# Altium PCB PCB1.pcbdoc
Units mil, origin at the board's own origin, x right, y up, seen from the top; angles counter-clockwise.
Board outline 2978.5 x 3631.66 mil, 2 copper layers (Top Layer, Bottom Layer); 9 components, 11 nets, 30 pads, 0 vias.
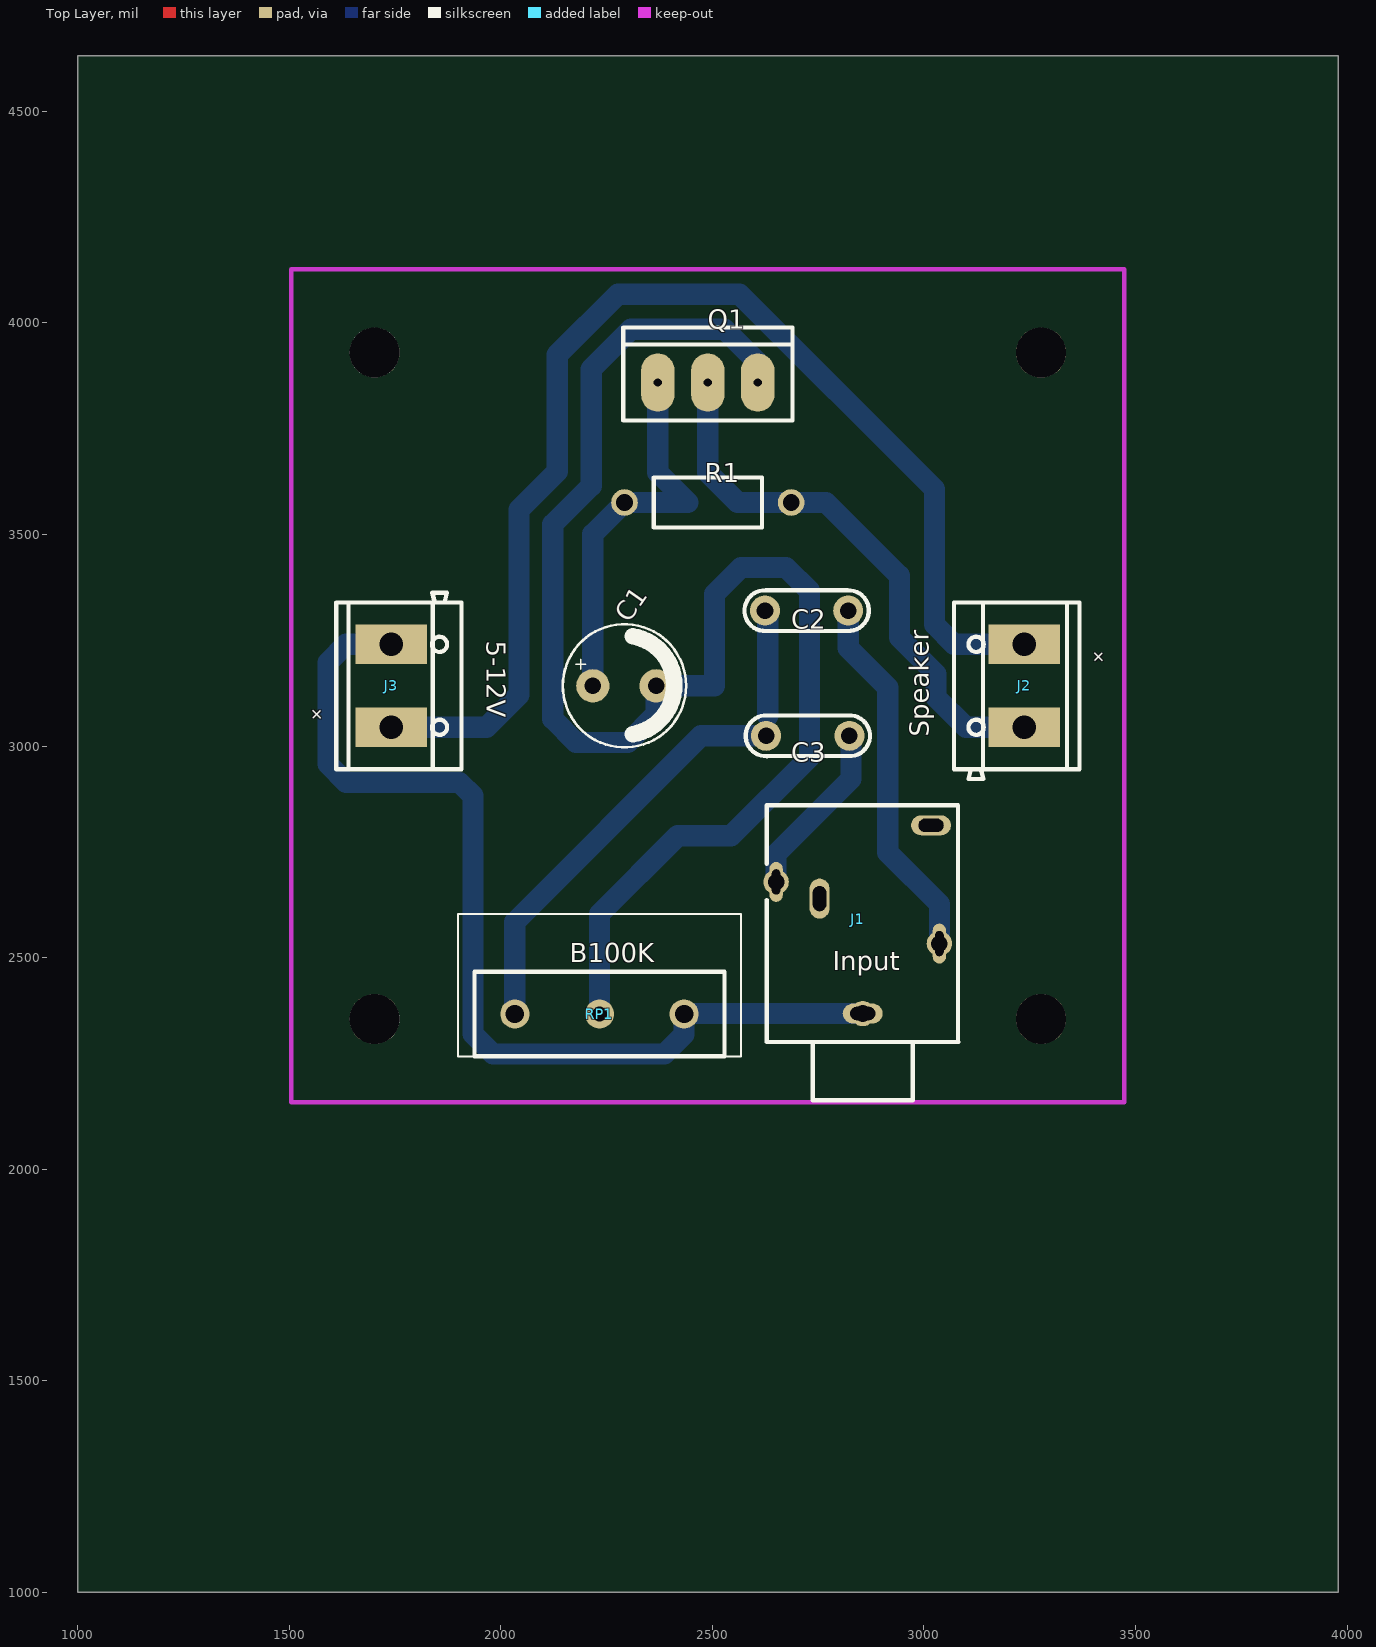
[diagram p0: Top Layer view]
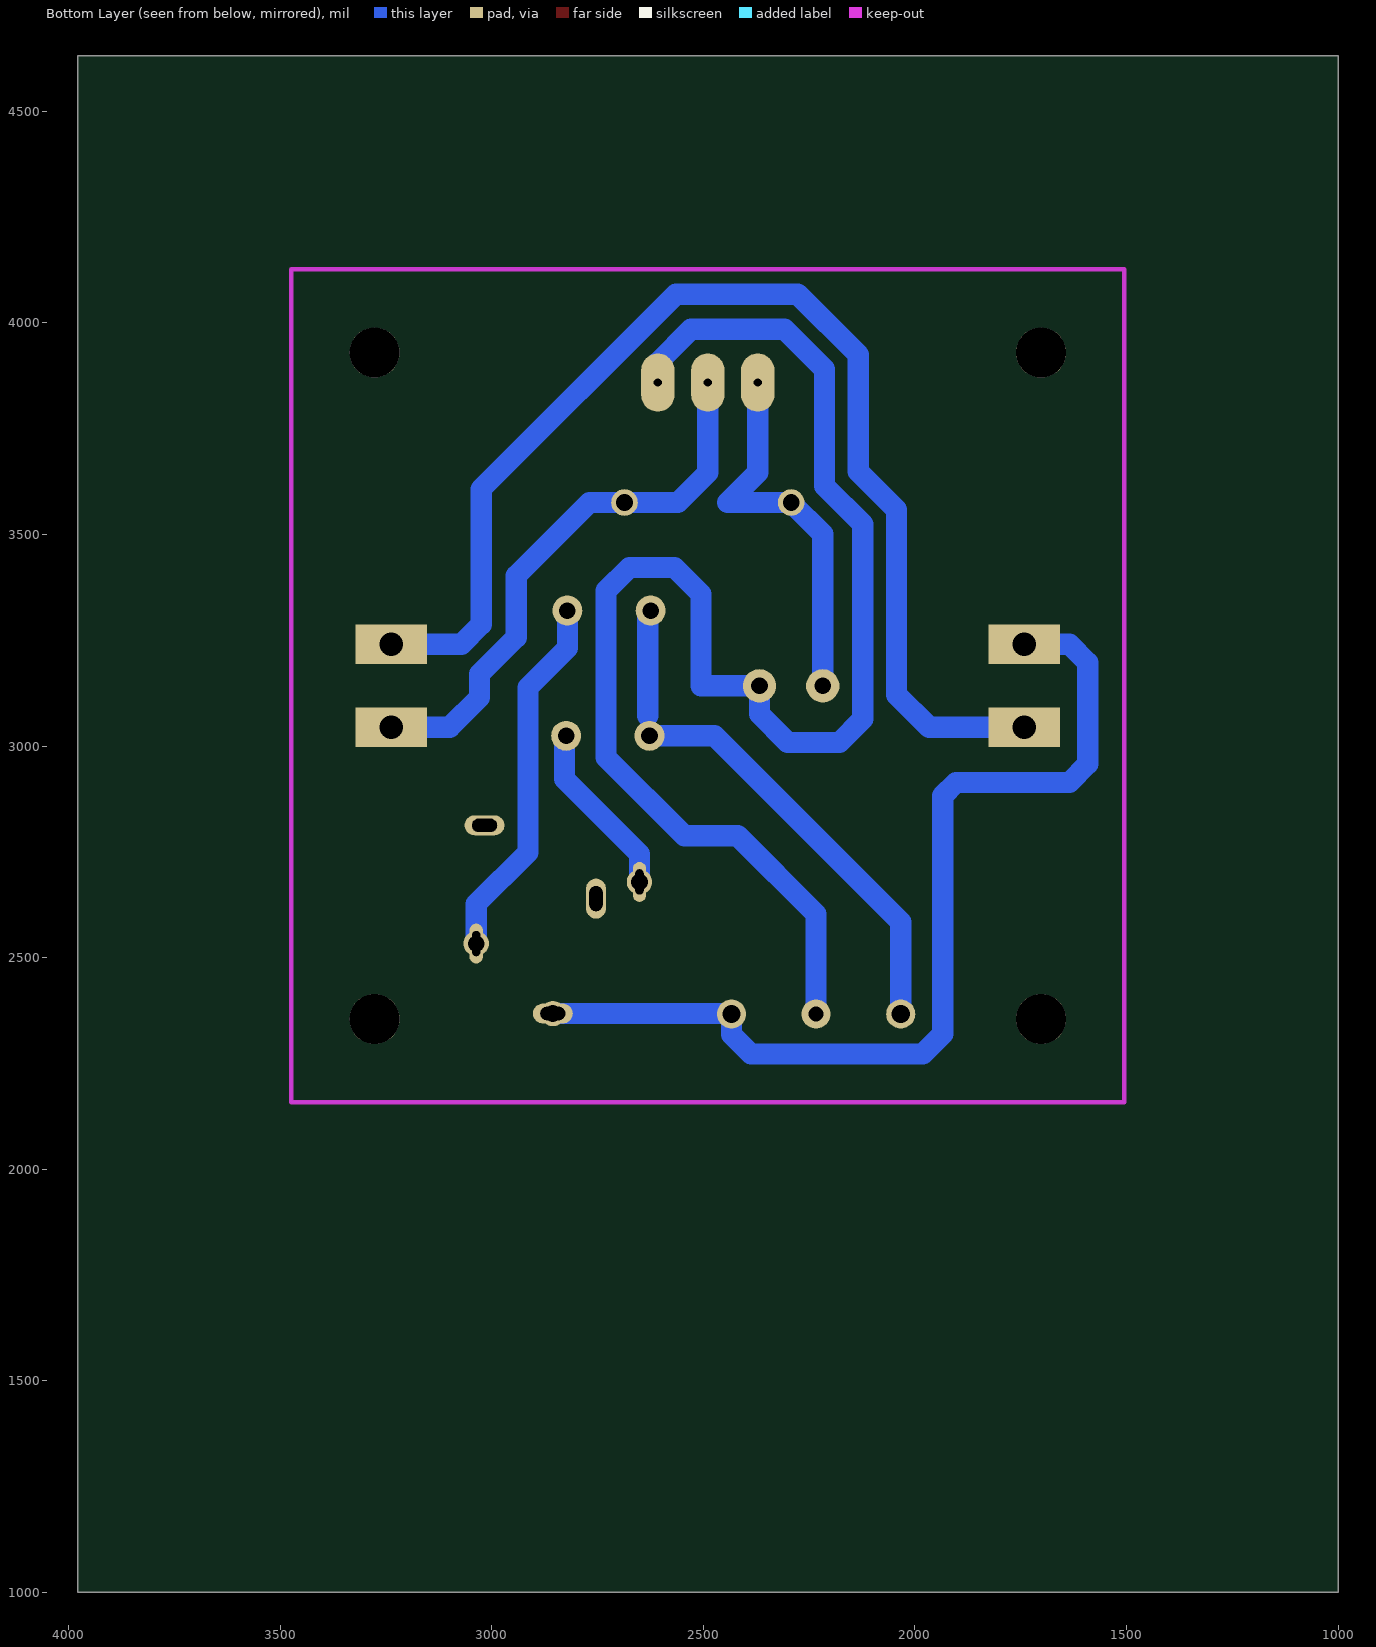
[diagram p1: Bottom Layer view, seen from below]

## Layer stack, top to bottom
Top Solder: solder mask 0.4, Solder Resist, Dk 3.5
Top Layer: signal copper 1.4
Dielectric1: dielectric 12.6, FR-4, Dk 4.8
Bottom Layer: signal copper 1.4
Bottom Solder: solder mask 0.4, Solder Resist, Dk 3.5

## Board outline
3978.5,1000 1000,1000 1000,4631.66 3978.5,4631.66

## Design rules (kind name [scope] priority, off if disabled: settings)
Clearance [All] p1: gap=10 ignorepadtopadclearanceinfootprint=FALSE
PolygonConnect [All] p1: connectstyle=Relief reliefconductorwidth=10 reliefentries=4 polygonreliefangle="90 Angle" airgapwidth=10
RoutingVias [All] p1: holewidth=28 width=50 viastyle="Through Hole" minholewidth=28 minwidth=50 maxholewidth=28 maxwidth=50
SolderMaskExpansion [All] p1: expansion=0 istentingtop=FALSE
Width [All] p1: maxlimit=10 minlimit=10 preferedwidth=10
30 further rules are at their usual default settings.

## Components (designator, comment, footprint, x,y, rotation, side; value= is the part's Value field where it differs from the comment)
C1 "470uF/50V" ELCO50V100UF 2292.4,3142.41 r0 top
C2 "473nF" CAP-5MM-THIN-MYLAR 2722.68,3320.05 r180 top
C3 "473nF" CAP-5MM-THIN-MYLAR 2725.47,3024.3 r180 top
J1 "Input" AUDIO-TH_PJ324 2843.58,2590.36 r180 top
J2 "Speaker" TERMINAL_BLOCK_2P_5 3237.28,3142.41 r90 top
J3 "5-12V" TERMINAL_BLOCK_2P_5 1741.22,3142.41 r270 top
Q1 "TIP41C" TIP41C 2489.25,3858.94 r0 top
R1 "1k8" RD-6X2.5-1/4W 2489.25,3575.48 r0 top
RP1 "100k" POT-B10K 2233.34,2366.82 r0 top

## Footprints (in the part's own frame and the unit in brackets; to place one, negate y for a bottom-side part, rotate by r counter-clockwise, add the part's x,y. Pads: shape width x height; smd on the part's side, far side on the other; paste and mask are expansions set on the pad)
AUDIO-TH_PJ324 [mm]
  oval 2.4x1.2 hole 0.8 slot 1.5 at 0 deg paste-2539.97 mask+0.051: 1(-0.3,5.649) 4(-4.4,-5.649)
  oval 0.8x2.4 hole 0.5 slot 1.5 at 90 deg paste-2539.97 mask+0.051: 2(4.9,-2.25) 5(-4.9,1.449)
  oval 1.2x2.4 hole 0.8 slot 1.5 at 90 deg paste-2539.97 mask+0.051: 3(2.291,-1.249)
  silkscreen extent -6.04,-6.85 5.46,10.85
CAP-5MM-THIN-MYLAR [mm]
  round 1.8 hole 1 paste-2539.97 mask+0.102: 1(-2.499,0) 2(2.499,0)
  silkscreen extent -3.73,-1.22 3.72,1.23
ELCO50V100UF [mm]
  round 2 hole 1 paste-2539.97 mask+0.102: 1(-1.9,0) 2(1.9,0)
  silkscreen extent -3.7,-3.7 3.7,3.7
POT-B10K [mm]
  round 1.75 hole 1.1 paste-2539.97 mask+0.051: 1(-5.08,0) 3(5.08,0)
  round 1.75 hole 0.914 paste-2539.97 mask+0.051: 2(0,0)
  silkscreen extent -8.5,-2.54 8.5,6
RD-6X2.5-1/4W [mm]
  round 1.6 hole 1 paste-2539.97 mask+0.102: 1(-5,0) 2(5,0)
  silkscreen extent -3.25,-1.5 3.25,1.5
TERMINAL_BLOCK_2P_5 [mil]
  rect 93.7x168.7 hole 55.2 paste-99999 mask+2: 1(98,0) 2(-98,0)
  silkscreen extent -220,-130 197,166
TIP41C [mm]
  oval 2x3.5 hole 0.5 paste-2539.97 mask+0.051: 1(-3,0) 2(0,0) 3(3,0)
  silkscreen extent -5.08,-2.29 5.08,3.3

## Free pads (board coordinates)
  round 60 hole 39.37 paste-99999 mask+19.68: 1(2855.39,2367.95) 4(2650.67,2678.95) 5(3036.5,2533.26)
  round 118.11 hole 118.11 unplated paste-99999: ""(1701.85,2355.01) ""(1701.85,3929.81) ""(3276.65,2355.01) ""(3276.65,3929.81)

## Nets (pads, with @x,y where several pads share a name; then routed paths per layer and width w, separated by ;. In a path a pad name is that pad's centre, name@x,y a point inside that pad or via, vN(x,y) a via of type N, cw(c..) or ccw(c..) an arc to the next point about the centre after c; other vN are vias at no path point)
J1_1: J1.1 J3.2 pad.1 RP1.3 | length 2352.6
  Bottom Layer w50: J3.2@1741.2,3240.46 1634.5,3240.46 1591.6,3197.56 1591.6,2957.36 1634.9,2914.06 1902.6,2914.06 1934.1,2882.56 1934.1,2319.56 1981.4,2272.36 2386.9,2272.36 2433.3,2318.76 RP1.3@2433.3,2366.86 ; RP1.3@2433.35,2366.82 2434.48,2367.95 J1.1
J1_2: C3.1 J1.2 pad.4 | length 420.4
  Bottom Layer w50: J1.2 2650.67,2744.77 2827.83,2921.94 2827.83,3020.34 C3.1
J1_3: J1.3
J1_4: J1.4
J1_5: C2.1 J1.5 pad.5 | length 876
  Bottom Layer w50: C2.1@2821.1,3320.06 2821.1,3231.86 2914.4,3138.56 2914.4,2847.16 2914.4,2748.76 3036.5,2626.66 J1.5
J3_1: J2.1 J3.1 | length 2867.3
  Bottom Layer w50: J3.1 1966,3044.36 2043,3121.36 2043,3558.36 2133.6,3648.96 2133.6,3924.56 2276.7,4067.56 2564.1,4067.56 3024.7,3606.96 3024.7,3287.16 3071.4,3240.46 J2.1@3237.3,3240.46
Q1_1: C1.1 Q1.1 R1.1 | length 926.5
  Bottom Layer w50: C1.1 2217.6,3500.68 R1.1 ; R1.1 2442,3575.46 2371.2,3646.36 Q1.1@2371.2,3858.96
Q1_2: J2.2 Q1.2 R1.2 | length 1327.8
  Bottom Layer w50: Q1.2@2489.2,3858.96 2489.2,3646.26 2560.1,3575.46 R1.2 2768.8,3575.46 2942,3402.26 2942,3256.56 3028.6,3169.96 3028.6,3114.66 3099.1,3044.36 J2.2
Q1_3: C1.2 Q1.3 RP1.2 | length 3645.5
  Bottom Layer w50: RP1.2@2233.3,2366.86 2233.3,2602.96 2418.4,2788.06 2544.3,2788.06 2729.4,2973.16 2729.4,3366.86 2674.3,3421.96 2568,3421.96 2505,3358.96 2505,3142.46 2367.2,3142.46 2367.2,3075.46 2300.3,3008.56 2178.2,3008.56 2123.1,3063.66 2123.1,3524.26 2213.7,3614.86 2213.7,3890.46 2308.1,3984.96 2528.6,3984.96 2607.3,3906.16 Q1.3@2607.3,3858.96
RP1_1: C2.2 C3.2 RP1.1 | length 1244.6
  Bottom Layer w50: RP1.1@2033.3,2366.86 2033.3,2584.16 2473.5,3024.26 C3.2 ; C2.2 2630.98,3313.34 2630.98,3071.54
S$22: 

## Polygon pours and split planes (outlines as drawn)
J1_1 on Bottom Layer "Bottom Layer-J1_1" (solid, pour order 0): 1505,4126.66 1505,2158.16 3473.5,2158.16 3473.5,4126.66

## Text inside footprints (layer, text, board x,y; h text height)
J2: Top Overlay "+" at 3415.67,3232.01 h30 r225
J3: Top Overlay "+" at 1562.83,3052.8 h30 r45
RP1: Top Overlay "B100K" at 2163.35,2489.32 h45